# Altium PCB STM32H743I-EVAL2PCBDESIGN.PcbDoc (part 16 of 23)
Units mil, origin at the board's own origin, x right, y up, seen from the top; angles counter-clockwise.
Board outline 6558 x 5417 mil, 8 copper layers (L1_TOP, L2_GND, L3_HS1, L4_POWER, L5_SIG, L6_HS2, L7_GND, L8_BOTTOM), stack 61.368 mil thick; 620 components, 588 nets, 2945 pads, 1724 vias.
Unrouted connection lines stored in the file: 1.
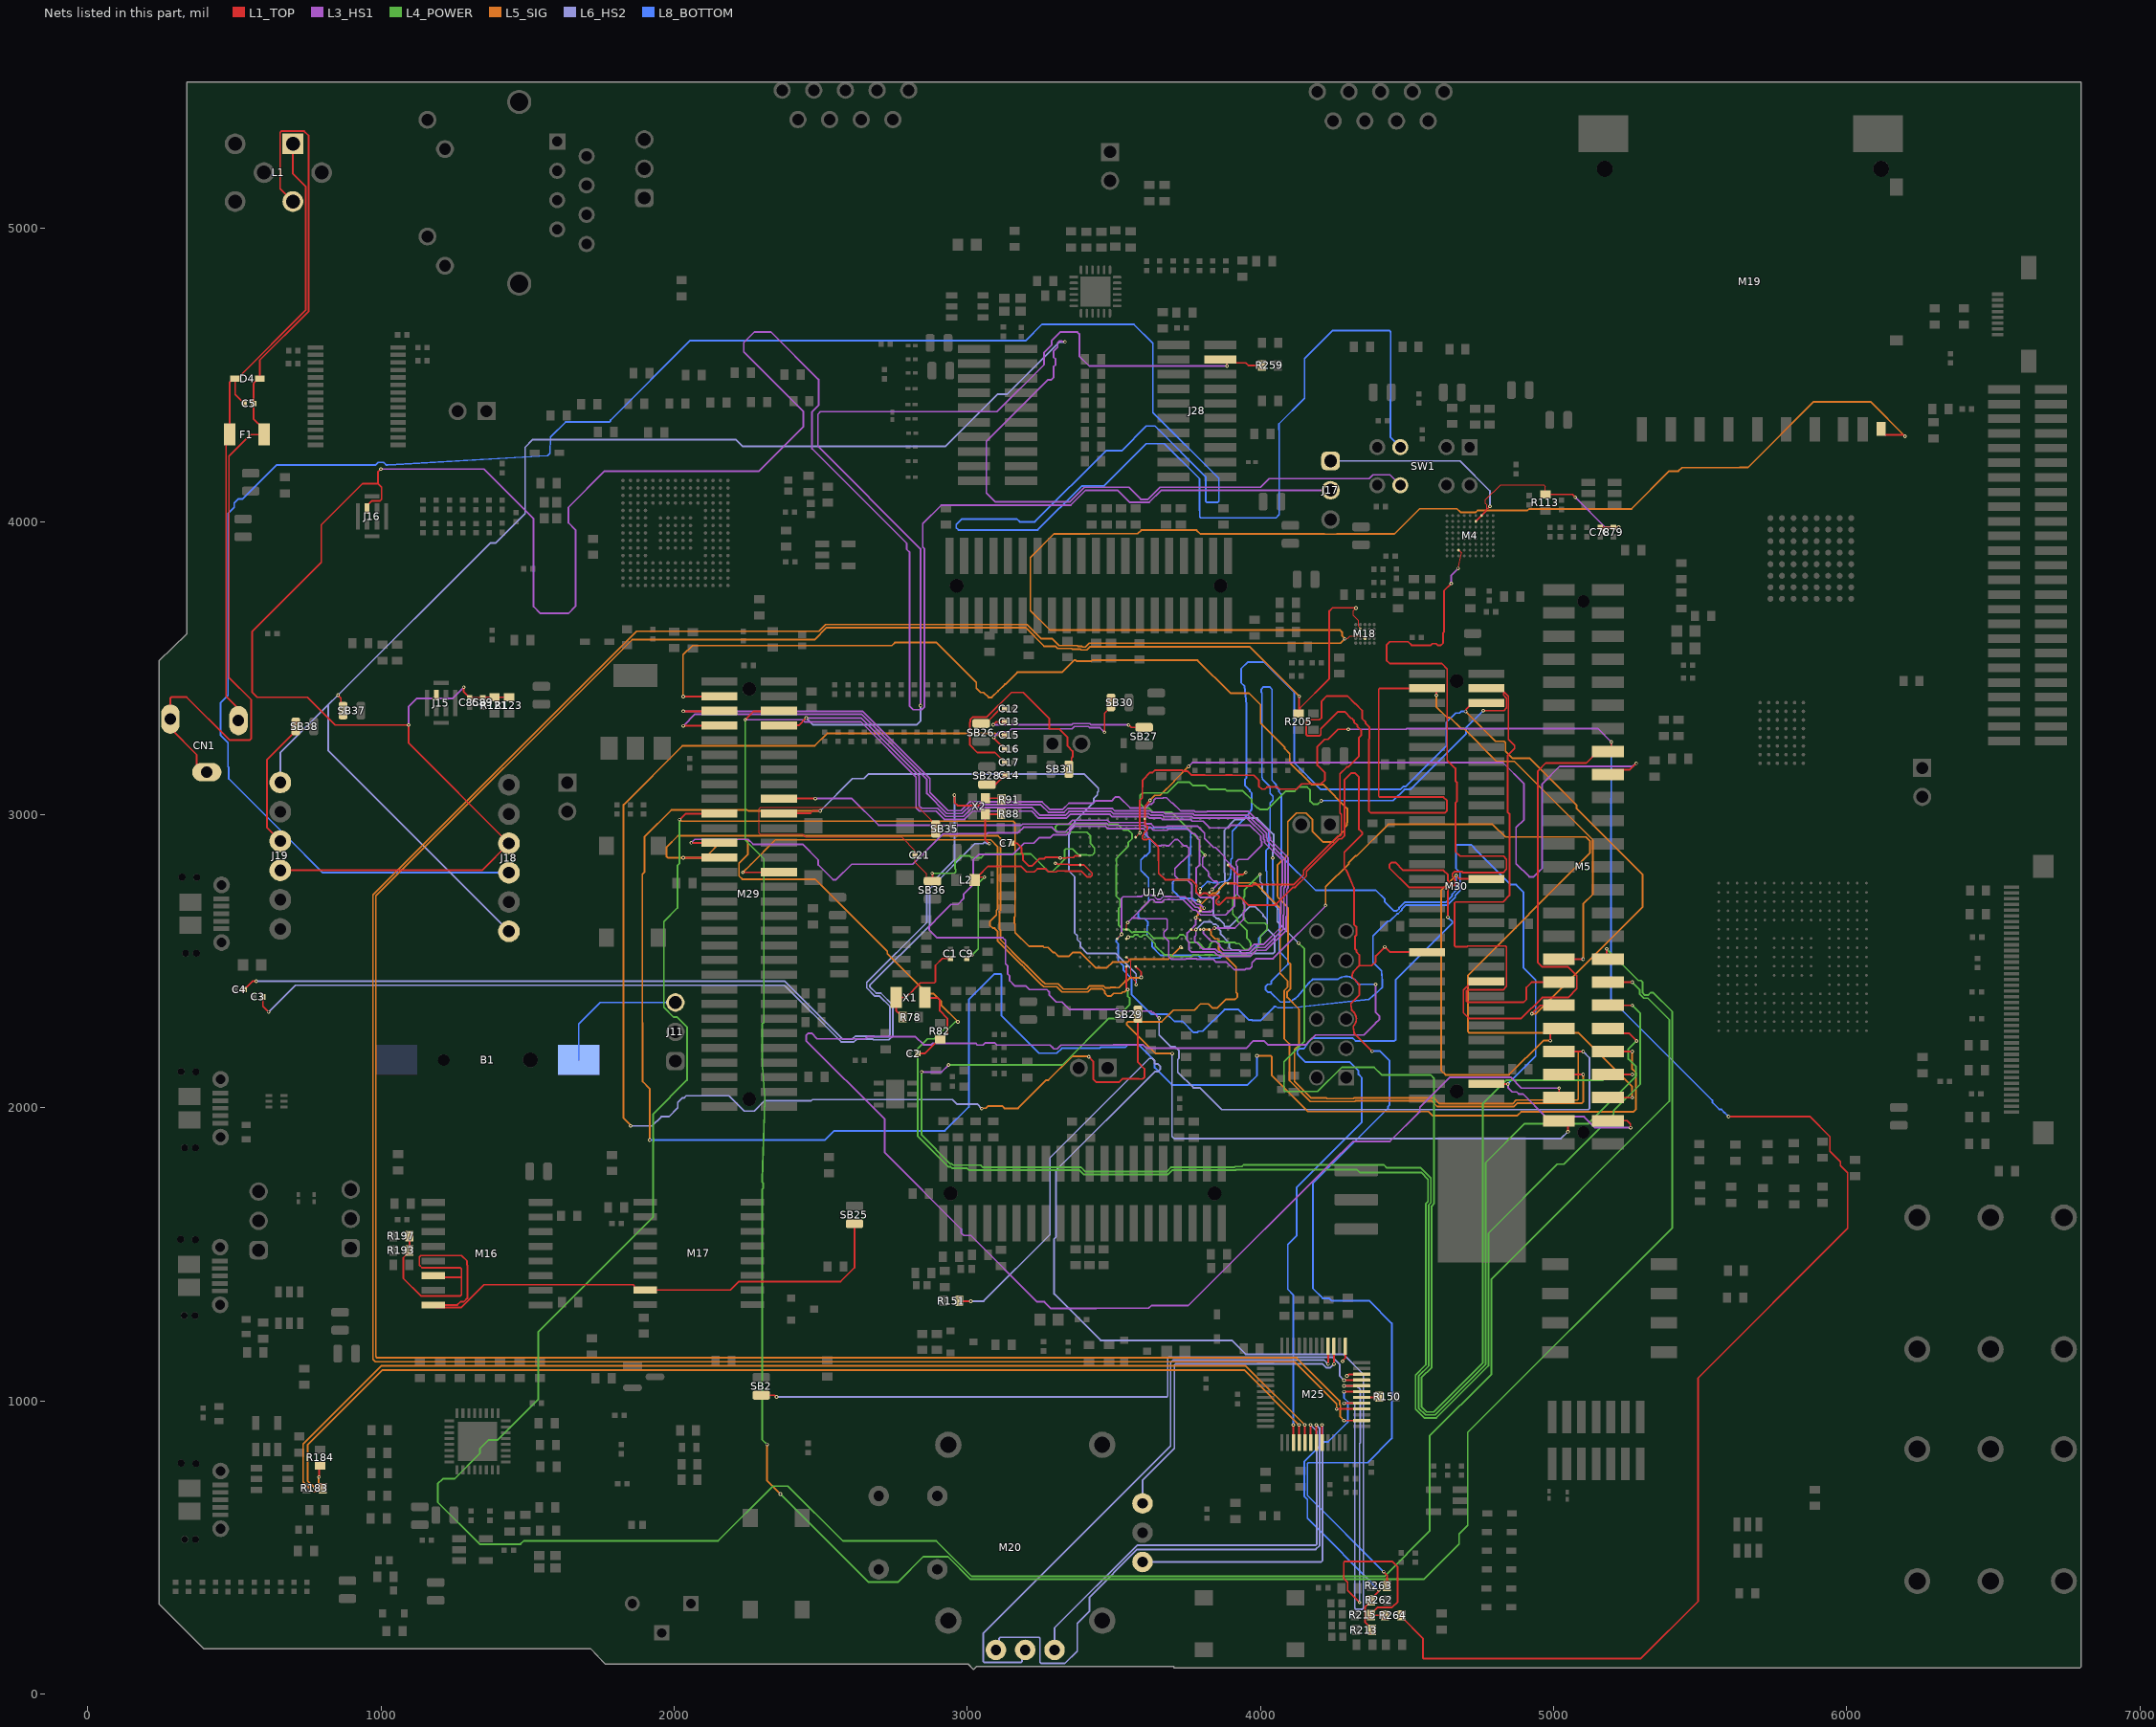
[diagram p13: the nets of this part, all layers, seen from the top]

## Via types
v1: diameter 12, hole 6, L1_TOP to L8_BOTTOM, tented both sides, 1724 vias

## Nets (pads, with @x,y where several pads share a name; then routed paths per layer and width w, separated by ;. In a path a pad name is that pad's centre, name@x,y a point inside that pad or via, vN(x,y) a via of type N, cw(c..) or ccw(c..) an arc to the next point about the centre after c; other vN are vias at no path point) (continued)
LCD_B6: M5.33 M30.22 R263.2 U1A.A8 | length 7776.4
  L1_TOP w6: v1(3623,3049) 3616,3042 3616,3039.62 3605.52,3029.13 3605.52,2967.21 3614.52,2958.21 3614.52,2949.9 3601.99,2937.38 3601.99,2932.57 3597.09,2927.67 3597.09,2919.49 3602.03,2914.56 3611.5,2914.56 3614.54,2917.6 3624.02,2917.6 3648.97,2892.65 3650.54,2891.07 3650.69,2889.23 3652,2883.38 3652.3,2800.48 3674.78,2778 3763.23,2778 3782.44,2758.79 3782.44,2753.82 3781,2752.38 3781,2735.58 3791,2725.58 3797.99,2725.58 3804.33,2731.93 3816.15,2731.93 3823.07,2725.01 3855.26,2725.01 3858.77,2721.49 3858.77,2716.52 3848.49,2706.24 3848.49,2698.78 3853.76,2693.51 3861.22,2693.51 3883.71,2716 3934,2716 3959,2691 4049.62,2691 4110.62,2752 4118.14,2752 4157,2790.86 4157,2805.81 4268.52,2917.33 4275.67,2917.33 4286.22,2927.87 4286.22,3117.6 4310.62,3142 4321.38,3142 4336,3127.38 4336,2949.71 4347.28,2938.42 4347.28,2933.14 4285.75,2871.6 4285.75,2816.86 4293.36,2809.24 ; 4293.38,2809.22 cw(c4289.12,2805) 4294.65,2807.33 4318.53,2750.61 cw(c4313,2748.28) 4319,2748.29 4319,2625.5 4327,2617.5 4327,2588.81 4323,2584.81 4323,2541.63 4327,2537.63 4327,2531.64 4337,2521.64 4337,2485 ; 4308.67,2352.95 cw(c4314.65,2353.53) 4310.64,2358 4337,2384.36 4337,2421.64 4313.74,2444.9 cw(c4317.99,2449.14) 4312.3,2451.06 4316.24,2462.72 cw(c4321.93,2460.8) 4317.68,2465.04 4337,2484.36 4337,2485 ; 4308.68,2352.9 4310.76,2333.13 4312.26,2331.63 ccw(c4316.51,2335.87) 4312.3,2331.59 4313.95,2330.26 cw(c4292,2303) 4316.82,2278.33 4316.82,2275.96 4316.82,2275.65 4319,2255 4320.5,2253.5 v1(4381,2193) ; v1(4420,417) 4431.56,405.44 R263.2@4431.56,369 ; M30.22@4568,2531 4442,2531 v1(4424,2549) 4393,2518 4393,2498.47 4379.53,2485 4337,2485 ; M5.33@5185.32,3136.92 5201.82,3153.42 5260.42,3153.42 v1(5282,3175)
  L3_HS1 w6: v1(3755,3165) 3767.81,3177.81 4827,3177.81 4899,3105.81 4899,2982.96 4872,2955.96 4872,2833.12 4917.12,2788 4932.03,2788 4954,2809.97 4954,2810.1 4961,2817.1 4961,3104.81 5021.19,3165 5270.79,3165 5280.79,3175 v1(5282,3175)
  L5_SIG w6: v1(3623,3049) 3640,3066 3657.67,3066 3705.76,3114.09 3705.76,3115.76 v1(3755,3165)
  L8_BOTTOM w6: v1(4381,2193) 4408.38,2193 4440,2161.38 4440,2008.2 4435,2003.2 4435,1997.57 4179,1741.57 4179,1383.05 4212,1350.05 4233.1,1350.05 4241.65,1341.5 4370.79,1341.5 4448,1264.29 4448,871.62 4365.38,789 4163.51,789 4160,785.49 4160,677 v1(4420,417)
LCD_B7: M5.35 M30.17 R264.2 U1A.C7 | length 8672
  L1_TOP w2: U1A.C7@3574.02,2922.98 v1(3588.99,2937.95)
  L1_TOP w6: v1(3588.99,2937.95) 3588.99,2958.28 3587.52,2959.75 3587.52,3047.9 3596.76,3057.14 3596.76,3093.61 3598,3094.86 3598,3118.38 3623.62,3144 3632.16,3144 3640.38,3152.22 3732.62,3152.22 3736.72,3148.12 3751.8,3148.12 3764.92,3135 3809.58,3135 3809.8,3134.78 3881.2,3134.78 3881.42,3135 3902.58,3135 3902.8,3134.78 3977.22,3134.78 3994,3118 3994,3097.62 4004.62,3087 4015.38,3087 4022.38,3094 4058.14,3094 4065.14,3087 4123.27,3087 4141.27,3105 4206.53,3105 4220,3118.47 4220,3142.18 4194,3168.18 4194,3231.82 4219.03,3256.85 4230.35,3256.85 4264.49,3291 v1(4300,3291) ; R264.2@4479.56,268 4479.56,264.06 4554,189.62 4554,123.51 4557.51,120 5297,120 5493,316 5493,1078 6003,1588 6003,1777.32 5978.5,1801.82 5978.5,1815.96 5942.72,1851.75 5942.72,1901.24 5873.95,1970 v1(5597,1970) ; M30.17@4770.99,2431 4723.47,2431 4704.47,2412 4702.43,2412 4692.48,2402.04 4692.48,2324.1 4711.58,2305 4890.08,2305 4961.1,2376.02 5049.16,2376.02 5079,2405.86 5079,2450.66 5049.16,2480.5 4961.1,2480.5 4946.34,2495.26 4946.34,3148.66 4973.76,3176.08 5111.24,3176.08 5150.82,3215.66 M5.35@5185.32,3215.66 5197,3227.34 v1(5197,3248)
  L3_HS1 w6: v1(4300,3291) 4496.07,3291 4499.07,3294 5151,3294 v1(5197,3248)
  L8_BOTTOM w6: v1(5197,3248) 5197,3055.92 5196,3054.92 5196,2371 5542,2025 5542,2017.47 5565.16,1994.31 5572.69,1994.31 5584.27,1982.73 5584.41,1982.73 5597,1970.14 v1(5597,1970)
LCD_G0: J28.17 M5.4 M29.53 R259.1 U1A.N14 | length 8635.8
  L1_TOP w2: U1A.N14@3794.5,2608.02 3794.98,2608.51 3805.51,2608.51 v1(3806,2609)
  L1_TOP w6: M29.53@2358.5,3305 2425,3305 v1(2450,3330) ; J28.17@3863.12,4553 3874.69,4541.43 J28.17@3886,4541.43 ; v1(3886,4531) J28.17@3886,4541.43 ; R259.1@4004.44,4533 3958.57,4533 3950.13,4541.43 J28.17@3886,4541.43 ; M5.4@5018,1955.82 5032.5,1955.82 5049,1939.32 v1(5049,1918)
  L3_HS1 w6: v1(2450,3330) 2637.43,3330 2835,3132.43 2835,3030.95 2843.95,3022 2897.76,3022 2925.76,2994 2986.24,2994 3016.24,3024 3221.62,3024 3247.62,2998 3333.81,2998 3346.81,3011 3490.47,3011 3498.47,3003 3620.1,3003 3624.73,2998.36 3664.97,2998.36 3670.33,2993 3766.38,2993 3771.38,2988 3954.28,2988 4011,2931.28 4011,2916.53 4014,2913.53 4014,2905.04 4074,2845.04 4074,2757.81 4070,2753.81 4070,2662.95 4068,2660.95 4068,2614.62 4010.38,2557 3977.38,2557 3957.38,2537 3874.62,2537 3861,2550.62 3861,2554.38 3847.38,2568 3831.62,2568 3805.62,2594 3805.62,2608.62 v1(3806,2609) ; v1(2840,3372) 2840,3907 2490,4257 2490,4366.19 2498.81,4375 3101,4375 3262,4536 3262,4577.62 3288,4603.62 3288,4617.76 3316.76,4646.51 3375.49,4646.51 3382,4640 3382,4565 3416,4531 v1(3886,4531)
  L5_SIG w6: v1(3699,2185) 3643.35,2185 3543.84,2284.51 3543.84,2289.49 3547.35,2293 3662.62,2293 3702.62,2333 3774.33,2333 3795.33,2354 3822.67,2354 3836.66,2340.01 3852.34,2340.01 3882.32,2370 3913.38,2370 3921,2377.62 3921,2389.15 3917,2393.15 3917,2480.47 3857,2540.47 3857,2572.49 3853.49,2576 3844.62,2576 3831.5,2589.11 3831.5,2600 3823.5,2608 3807,2608 v1(3806,2609)
  L6_HS2 w6: v1(2450,3330) 2473,3307 2828,3307 2840,3319 v1(2840,3372) ; v1(3699,2185) 3698,2184 3698,1901.51 3704.51,1895 5026,1895 v1(5049,1918)
LCD_G1: M5.6 M29.54 U1A.N13 | length 10997.8
  L1_TOP w4: U1A.N13@3763,2608.02 v1(3780,2608)
  L1_TOP w6: v1(2031,3303) M29.54@2153.5,3303 ; M5.6@5018,2034.56 5019,2035.56 v1(5019,2067)
  L3_HS1 w6: v1(2031,3303) 2071,3343 2638.57,3343 2862,3119.57 2862,3071.9 2929.9,3004 2982.1,3004 3012.1,3034 3250.47,3034 3276.47,3008 3329.67,3008 3342.67,3021 3494.62,3021 3502.62,3013 3624.24,3013 3628.87,3008.36 3669.11,3008.36 3674.47,3003 3770.52,3003 3775.52,2998 3958.43,2998 4021,2935.43 4021,2920.67 4024,2917.67 4024,2909.18 4084,2849.18 4084,2753.67 4080,2749.67 4080,2658.81 4078,2656.81 4078,2610.47 4014.53,2547 3981.53,2547 3961.53,2527 3866.93,2527 3862.93,2531 3856.93,2531 3846.93,2541 3804.38,2541 3782.38,2563 3779.62,2563 3776,2566.62 3776,2584.5 3780,2588.5 v1(3780,2608) ; v1(4393,2421.14) 4393,2325.38 4406,2312.38 4406,2301.62 4398.38,2294 4396.51,2294 4393,2290.49 4393,2288.62 4352.38,2248 4187.5,2248 4154.5,2215 4024.62,2215 4011.62,2228 3975.57,2228 3950.57,2203 3611.34,2203 3599.34,2215 3499.61,2215 3498.61,2214 3319.38,2214 3311.38,2206 3306.38,2201 3295.62,2201 3290.62,2206 3282.62,2214 3101.14,2214 3094.14,2221 3060.53,2221 3053.53,2214 3034.47,2214 3028.47,2220 2882.67,2220 2877.67,2215 2850.33,2215 2823.33,2242 2658.86,2242 2651.86,2235 2487.38,2235 2468.38,2254 2457.62,2254 2450,2246.38 2450,2228.86 2718.14,1960.72 2718.14,1847 2979,1586.14 2979,1572.62 2987.62,1564 3011.76,1564 3237.76,1338 3262.76,1338 3285.76,1315 3439.38,1315 3440.38,1316 3618.86,1316 3627.86,1325 3753.62,1325 4272.62,1844 4274.42,1844 4315.42,1885 4441.38,1885 4544,1987.62 4544,2001.38 4646.62,2104 4853.53,2104 4890.53,2067 v1(5019,2067)
  L6_HS2 w6: v1(3780,2608) 3806,2634 3831.43,2634 3839.43,2626 3848.38,2626 3856,2618.38 3856,2611.43 3864.43,2603 3864.43,2592.04 3893,2563.47 3893,2547.62 3902.62,2538 3925.24,2538 3936.24,2527 4044.49,2527 4048,2530.51 4048,2586 4023,2611 4023,2640.72 4009.69,2654.02 4009.69,2658.69 3982.38,2686 3963.38,2686 3895.46,2618.08 3877.64,2618.08 3876,2619.72 3876,2626.67 3856.67,2646 3849.72,2646 3839,2656.72 3839,2716.47 3858,2735.47 3858,2747.28 3879,2768.28 3879,2799.67 3877,2801.67 3877,2946.76 3914.23,2983.99 3944.96,2983.99 3948.97,2988 3989.43,2988 4045,2932.43 4045,2875.57 4042,2872.57 v1(4042,2852)
  L8_BOTTOM w6: v1(4042,2852) 4042,2774.13 4044,2772.13 4044,2695.88 4065,2674.88 4065,2532.38 4094,2503.38 4094,2489.33 4037.46,2432.79 4037.46,2424.51 4033.94,2421 4024.62,2421 4017,2413.38 4017,2402.62 4025.76,2393.85 4035.06,2393.85 4067.91,2361 4098.02,2361 4119.38,2373 4127,2380.62 4165.34,2425.68 cw(c4192,2403) 4167.29,2427.79 4177.5,2438 4263.72,2438 cw(c4292,2403) 4331.67,2424.25 ccw(c4336.92,2427.14) 4336.47,2421.16 4336.7,2421.14 4336.92,2421.14 v1(4393,2421.14)
LCD_G2: M5.8 M29.56 U1A.M14 | length 5522.7
  L1_TOP w2: v1(3779,2648) 3780.91,2646.09 3787.93,2646.09 U1A.M14@3794.5,2639.52
  L1_TOP w6: v1(2031,3353) M29.56@2153.5,3353 ; M5.8@5018,2113.3 v1(5100.86,2113.3)
  L3_HS1 w6: v1(2031,3353) 2642.72,3353 2872,3123.72 2872,3076.05 2934.05,3014 2977.95,3014 3007.95,3044 3254.62,3044 3280.62,3018 3325.53,3018 3346.53,3039 3429.53,3039 3437.53,3047 3492,3047 3497,3052 3497,3052.38 3504.62,3060 3518.38,3060 3555.38,3023 3609,3023 3622,3036 3628.38,3036 3636,3043.62 3636,3050 3642,3056 3666.62,3056 3668.62,3058 3679.38,3058 3697.38,3040 3700.38,3040 3727.38,3013 3774.66,3013 3777.66,3010 3817.53,3010 3818.48,3010.95 3959.62,3010.95 4031,2939.57 4031,2924.81 4034,2921.81 4034,2913.33 4094,2853.33 4094,2749.53 4090,2745.53 4090,2654.67 4088,2652.67 4088,2606.33 4018.67,2537 3985.67,2537 3965.67,2517 3862.78,2517 3858.78,2521 3852.78,2521 3842.78,2531 3765.51,2531 3756,2540.51 3756,2565.14 3750,2571.14 3750,2596.38 3774.62,2621 3775.49,2621 3779,2624.51 v1(3779,2648)
  L5_SIG w6: v1(3779,2648) 3779,2649.62 3786.73,2657.35 3786.73,2665.73 3795,2674 3795,2691.38 3835.62,2732 3846.47,2732 3881.47,2767 3982.38,2767 4024.69,2724.69 4024.69,2723.32 4067,2681.01 4067,2458.24 4092.52,2432.73 4092.52,2411.19 4081,2399.67 4081,2235.62 4099,2217.62 4099,2092.43 4170.43,2021 4321.43,2021 4324.43,2024 4583,2024 4603.43,2003.57 4864.1,2003.57 4876.53,2016 5097.34,2016 5100.86,2019.51 v1(5100.86,2113.3)
LCD_G3: M5.10 M29.58 U1A.L14 | length 9876.3
  L1_TOP w2: U1A.L14@3794.5,2671.02 3794.63,2671.02 3802.7,2679.09 3806.09,2679.09 v1(3808,2681)
  L1_TOP w6: v1(2031,3403) M29.58@2153.5,3403 ; M5.10@5018,2192.04 v1(5100.86,2192.04)
  L3_HS1 w6: v1(3654,2306) 3636,2324 3631.76,2324 3625.76,2330 3518.81,2330 3513.81,2335 3349.24,2335 3323.24,2361 3302.79,2361 3279,2384.79 3279,2395.38 3271.38,2403 3211.38,2403 3198.38,2416 3161.57,2416 3144,2433.57 3144,2450.19 3138,2456.19 3138,2482.72 3130,2490.72 3130,2571.14 3121.14,2580 2896,2580 2870.25,2605.75 2870.25,2617.99 2890,2637.75 2890,2639.67 2944.33,2694 2959.28,2694 2967.67,2694 2987,2713.33 2987,2727.47 3019.82,2760.3 3019.82,2845.54 3038.49,2864.21 3154.4,2864.21 3193.19,2903 3226.38,2903 3245.38,2922 3283.38,2922 3292.38,2931 3337.52,2931 3367.52,2961 3469.76,2961 3477.76,2953 3599.38,2953 3612,2940.38 3612,2929.62 3648.16,2893.46 3660.1,2893.46 3662.65,2896 3676,2896 3678.54,2893.46 3686.94,2893.46 3708.49,2915 3717.25,2915 3738.79,2893.46 3747.56,2893.46 3756.53,2884.49 3756.53,2864.05 3708,2815.53 3708,2791.09 3721.09,2778 3749.38,2778 3765.5,2761.89 3765.5,2711.12 3782.62,2694 3795,2694 v1(3808,2681)
  L5_SIG w6: v1(2031,3403) 2030.17,3403.83 2030.17,3545.26 2061.92,3577 2742.47,3577 2752.47,3587 2894.53,3587 3030.72,3450.81 3030.72,3432.15 3045.85,3417.02 3055.59,3417.02 3072.62,3400 3083.38,3400 3104.93,3421.54 3104.93,3422.25 3128.04,3445.36 3129.52,3445.36 3170.33,3486.18 3322.95,3486.18 3363.77,3527 3369.73,3527 3372.73,3524 3423.27,3524 3426.27,3527 3785.38,3527 3897.38,3415 3960.28,3415 4000,3375.28 4000,3312.38 4083,3229.38 4083,3225.14 4100,3208.14 4100,3177.47 4174.47,3103 4204,3103 4214.14,3103 4296.22,3020.93 4296.22,3010.78 4296.22,2973.81 4294.54,2972.13 4294.54,2963.13 4286.22,2954.81 4286.22,2946.03 4247.51,2907.33 4212.77,2907.33 4177.79,2942.31 4177.79,2982.49 4154.94,3005.33 4122.63,3005.33 4093,2975.7 4093,2862 4058,2827 4058,2722.12 4058,2721.99 4059,2718.08 4084.44,2691.85 4094,2682.3 4094,2498.47 4102.52,2489.96 4102.52,2407.04 4091,2395.53 4091,2376.47 4132,2335.47 4132,2214.53 4116,2198.53 4116,2089.57 4171.57,2034 4224.19,2034 4227.19,2031 4317.28,2031 4320.28,2034 4591,2034 4611.43,2013.57 4859.96,2013.57 4872.38,2026 5080.49,2026 5084,2029.51 5084,2188.52 5087.51,2192.04 v1(5100.86,2192.04)
  L6_HS2 w6: v1(3654,2306) 3654,2248.38 3694.38,2208 3708.53,2208 3722,2194.53 3722,2168.95 3718,2164.95 3718,2121.05 3771.05,2068 3793.53,2068 3868.23,1993.3 5118.78,1993.3 5122.3,1996.81 5122.3,2170.6 v1(5100.86,2192.04)
LCD_G4: M5.12 M30.31 U1A.K14 | length 4977.3
  L1_TOP w2: v1(3788,2707) 3790.01,2707 U1A.K14@3794.5,2702.51
  L1_TOP w6: v1(4668,2793) 4680,2781 M30.31@4770.99,2781 ; v1(4989,2229) 4989,2254.28 5005.5,2270.78 M5.12@5018,2270.78
  L5_SIG w6: v1(4668,2793) 4616,2741 4616,2127.62 4631.62,2112 4847.86,2112 4964.86,2229 v1(4989,2229)
  L8_BOTTOM w6: 3628.98,2571.4 3630,2570.38 3630,2549.47 3659.86,2519.62 3788.57,2519.62 3797.19,2511 3860.81,2511 3876.81,2527 3951.47,2527 3953.47,2529 3963.53,2529 3974.53,2540 3994,2559.47 3994,2577.38 4023,2606.38 4023,2688.6 4024,2689.6 4024,2763.84 4021.37,2766.47 4021.37,2806.15 4019,2808.53 4019,2877.54 4029,2887.54 4029,2945.33 4033,2949.33 4033,3040.53 4042.49,3050.01 4042.49,3063.27 4033,3072.76 4033,3095.38 4006.81,3121.58 4006.81,3125.33 4004.9,3127.23 4004.9,3415.71 4003,3417.62 4003,3428.38 4010.62,3436 4030.73,3436 4039.25,3427.49 4039.25,3117.42 4053,3103.67 4053,3094.43 4063,3084.43 4063,3078.13 4071,3070.13 4071,2859.02 4188.02,2742 4393.38,2742 4424,2711.38 4424,2702.62 4454.62,2672 4465.38,2672 4473,2679.62 4473,2682.64 4491.36,2701 4632.34,2701 4654.34,2723 4654.34,2728.87 4668,2742.53 v1(4668,2793) ; 3628.98,2571.45 3613.49,2586.94 3613.49,2620.1 3616,2622.62 3616,2633.38 3604.38,2645 3590.62,2645 3583,2652.62 3583,2667.87 3617.99,2702.86 3617.99,2783.39 3592,2809.38 3592,2845.38 3606.62,2860 3610.38,2860 3622,2871.62 3622,2916.62 3607,2931.62 3607,2942.38 3619.62,2955 3747.81,2955 3762,2940.81 3762,2867.47 3756.53,2862 3756.53,2781.67 3753.01,2778.15 3708.77,2778.15 3701,2770.38 3701,2741.62 3712.27,2730.34 3713.35,2730.34 3729.69,2714 3770,2714 3775.85,2708.15 3786.85,2708.15 v1(3788,2707)
LCD_G5: M5.14 M30.55 U1A.J14 | length 3831.9
  L1_TOP w2: v1(3794,2747) 3794.25,2746.75 3794.25,2734.26 U1A.J14@3794.5,2734.01
  L1_TOP w6: v1(4700,3352) 4701.15,3353.15 4701.15,3358.68 4723.47,3381 M30.55@4770.99,3381 ; v1(4926,2321) 4954.52,2349.52 M5.14@5018,2349.52
  L5_SIG w6: v1(4700,3352) 4801.47,3250.53 4831.48,3250.53 4836.24,3245.77 4836.24,3215.76 4859.88,3192.12 4919.27,3192.12 5078,3033.38 5078,3022.29 5303.44,2796.85 5303.44,2684.44 4940,2321 v1(4926,2321)
  L8_BOTTOM w6: v1(3794,2747) 3818.24,2771.24 3823.21,2771.24 3838.13,2767 3853.87,2767 3887.77,2774.76 3896.02,2783 3899.12,2804.2 3899.12,2821.03 3899,2821.16 3899,2846.84 3903.78,2851.62 3903.78,2943.92 3962.01,3006.07 3970.01,3018.37 3970.01,3073.52 3963,3080.53 3963,3084.28 3946.81,3100.47 3946.81,3119.53 3952,3124.72 3952,3376.63 3946,3438.38 3933.91,3450.47 3933.91,3497.68 3957.23,3521 4011.88,3521 4115.25,3417.63 4115.25,3176.37 4205.62,3086 4476.86,3086 4486.86,3096 4495.38,3096 4634,3234.62 4634,3314.86 4666.14,3347 4679.76,3347 4684.76,3352 v1(4700,3352)
LCD_G6: M5.16 M30.57 U1A.J15 | length 4104
  L1_TOP w2: U1A.J15@3825.99,2734.01 3825.99,2735 3835,2744.01 v1(3835,2745)
  L1_TOP w6: v1(4760,3355) 4830.4,3355 4839.51,3364.1 4839.51,3397.9 4829.51,3407.9 M30.57@4829.51,3420 ; M30.57@4770.99,3431 4818.51,3431 M30.57@4829.51,3420 ; M5.16@5018,2428.26 4924.88,2428.26 4907,2410.38 4907,2369.57 4897.43,2360 4706.58,2360 4702.48,2364.1 4702.48,2397.9 4706.58,2402 4827.4,2402 4839.51,2414.1 4839.51,2547.9 4835.41,2552 4706.58,2552 4703.58,2549 4665.51,2549 4662,2552.51 4662,2698.48 4665.51,2702 4827.4,2702 4849.51,2724.1 4849.51,3002.61 4843,3009.12 4843,3201.76 4866.85,3225.62 4866.85,3236.38 4846,3257.24 4846,3403.51 M30.57@4829.51,3420
  L3_HS1 w6: v1(3811,2862) 3811,2860.38 3802.53,2851.9 3802.53,2824.86 3822.38,2805 3822.38,2791.23 3840.62,2773 3851,2773 3854.51,2769.49 3854.51,2764.51 v1(3835,2745)
  L4_POWER w6: v1(3811,2862) 3792.53,2880.47 3792.53,2911.84 3696,3008.36 3633.62,3008.36 3618.98,3023 3603,3023 3590,3036 3590,3067 3597,3074 3682.62,3074 3719.62,3111 3757.62,3111 3769.62,3099 3812.47,3099 3825.47,3086 3880.14,3086 3884.14,3082 3938.81,3082 3970,3050.81 3970,3042.33 3989.33,3023 3992.33,3023 3997.33,3018 4024.67,3018 4043,3036.33 4043,3036.38 4086.62,3080 4116.69,3080 4130.69,3094 4159.38,3094 4169.5,3083.88 4169.5,3046.12 4179.62,3036 4196,3036 v1(4207,3047)
  L8_BOTTOM w6: v1(4207,3047) 4208,3048 4453,3048 4491,3086 4511.52,3086 4701.13,3275.62 4701.13,3296.13 v1(4760,3355)
LCD_G7: M5.18 M30.58 U1A.H17 | length 4196.2
  L1_TOP w6: U1A.H17@3888.98,2765.5 3889.22,2765.28 3917.19,2765.28 3925.47,2757 3971.35,2757 3976.35,2762 4114,2762 4147,2795 4147,2809.95 4264.37,2927.33 4271.53,2927.33 4276.22,2932.01 4276.22,3000.65 4271,3005.87 4271,3139.14 4294.86,3163 4298.51,3163 4336,3200.49 4336,3263.13 4344,3271.13 4344,3286.87 4331,3299.87 4331,3303.84 4319,3315.84 4319,3320.99 4311.38,3328.6 4309.31,3328.6 4286.91,3351 4264,3351 4205.72,3292.72 4205.72,3272.76 4201.62,3268.66 4160.38,3268.66 4156.28,3272.76 4156.28,3315.3 4164.76,3323.78 4201.62,3323.78 4208.55,3330.71 4208.55,3387.28 4226.27,3405 4296.47,3405 4322.47,3379 4323.46,3379 4347,3355.46 4347,3327.44 4359,3315.44 4359,3311.47 4372,3298.47 4372,3259.53 4370,3257.53 4370,3012.51 4376.51,3006 4628.41,3006 4636.52,3014.1 4636.52,3047.9 4624.41,3060 4407.18,3060 4403.66,3063.52 4403.66,3427.49 4407.18,3431 M30.58@4568,3431 4589,3431 4600,3420 v1(4600,3407) ; M5.18@5018,2507 v1(5100.86,2507)
  L5_SIG w6: v1(4600,3407) 4600,3368.36 4637.18,3331.18 4646.49,3331.18 4683.67,3294 4693.52,3294 4805.4,3182.12 4866.11,3182.12 5133.86,2914.37 5133.86,2728 5100.86,2695 v1(5100.86,2507)
LCD_R0: M5.3 M29.38 M30.03 U1A.P5 | length 6413.3
  L1_TOP w2: U1A.P5@3511.03,2576.53 v1(3526,2591.5)
  L1_TOP w6: v1(2058,2904) M29.38@2150.5,2904 ; M30.03@4770.99,2081 v1(4844,2081) ; M5.3@5185.32,1955.82 5251.18,1955.82 5261.85,1945.15 5261.85,1933.15 v1(5263,1932)
  L3_HS1 w6: v1(2058,2904) 2070,2916 2252,2916 2269,2899 2437.53,2899 2491,2845.53 2491,2828.62 2541.62,2778 2552.38,2778 2605.38,2831 2813.62,2831 2917.62,2935 3066.86,2935 3069.86,2938 3172.47,2938 3191.47,2957 3288.88,2957 3304.88,2941 3333.38,2941 3363.38,2971 3473.9,2971 3481.9,2963 3603.53,2963 3608.16,2958.36 3623.11,2958.36 3634.47,2947 3645.53,2947 3681.6,2947 3685.6,2951 3751.81,2951 3766.39,2936.42 3767.95,2936.42 3769.09,2935.28 3774.34,2935.28 3785.08,2924.54 3785.08,2919.29 3792.53,2911.84 3792.53,2829.91 3781,2818.38 3781,2732.38 3796.38,2717 3831.38,2717 3839,2709.39 3839,2676.92 3830.07,2668 3802.62,2668 3786.62,2684 3778.47,2684 3742.47,2720 3696.46,2720 3695.46,2721 3668.38,2721 3658.38,2711 3647.62,2711 3632.6,2726.02 3599.61,2726.02 3594.59,2721 3580.12,2721 3579.12,2720 3531.65,2720 3526,2714.35 v1(3526,2591.5) ; v1(4844,2081) 4845.15,2079.85 4845.15,2067.57 4858.72,2054 4874.38,2054 4881.38,2047 4895.53,2047 4973.03,1969.5 5103.97,1969.5 5141.47,1932 v1(5263,1932)
  L8_BOTTOM w6: v1(3526,2591.5) 3507.5,2573 3507.5,2566.94 3514.56,2559.89 3514.56,2501.11 3533,2482.67 3533,2468.53 3560,2441.53 3560,2386.62 3627.62,2319 3682.62,2319 3706.85,2294.76 3733.85,2294.76 3771.62,2257 3784.33,2257 3788.33,2261 3803.38,2261 3877.38,2335 3924.62,2335 3959.62,2300 3970.38,2300 3972.61,2297.78 4000.16,2297.78 4047.26,2344.88 4052.23,2344.88 4059.63,2341 4108.79,2341 4370.38,2370 4402.53,2398.14 4416,2411.61 4416,2430.67 4413,2467.47 4384,2496.47 4384,2586.53 4434.33,2636.86 4441.36,2636.86 4466.5,2662 4469.53,2662 4483,2675.47 4483,2678.5 4495.5,2691 4636.48,2691 4664.34,2718.86 4664.34,2724.73 4681,2741.38 4681,2802.73 4667,2816.73 4667,2893.49 4670.51,2897 4720,2897 4730,2887 4730,2885 4854,2761 4872.49,2761 4897,2736.49 4897,2478.05 4939,2436.05 4939,2176 v1(4844,2081)
LCD_R1: M5.5 M29.43 U1A.N6 | length 5851
  L1_TOP w4: U1A.N6@3542.53,2608.02 3542.53,2625.36 3547,2629.84 v1(3547,2632)
  L1_TOP w6: M29.43@2358.5,3055 v1(2481,3055) ; M5.5@5185.32,2034.56 v1(5268.18,2034.56)
  L3_HS1 w6: v1(2481,3055) 2605.86,3055 2696.86,2964 3184.33,2964 3188.33,2968 3346.24,2968 3359.24,2981 3478.05,2981 3486.05,2973 3607.67,2973 3612.3,2968.36 3627.25,2968.36 3638.62,2957 3677.46,2957 3681.46,2961 3785.38,2961 3809,2937.38 3809,2918.62 3839.65,2887.96 3846.35,2887.96 3878.67,2855.63 3878.67,2848.94 3911,2816.62 3911,2687.51 3881.49,2658 3795.87,2658 3779.87,2674 3772.18,2674 3736.18,2710 3692.31,2710 3691.31,2711 3684.69,2711 3683.69,2710 3671.53,2710 3662.53,2701 3643.47,2701 3634.47,2710 3625,2710 3562,2647 ; v1(3547,2632) 3562,2647 ; v1(4222,2690) 4222,2688.38 4219,2685.38 4219,2684.86 4043.14,2509 3985.95,2509 3971,2494.05 3971,2481.62 3963.38,2474 3950.66,2474 3947.66,2471 3927.72,2471 3910.44,2471 3884.44,2497 3848.5,2497 3838.5,2507 3782.81,2507 3781.81,2508 3746.19,2508 3745.19,2507 3695,2507 3687.01,2514.99 3687.01,2568.38 3670.48,2584.9 3670.48,2598.49 3682.04,2610.05 3682.04,2641.49 3678.52,2645 3582.69,2645 3580.69,2647 3562,2647
  L5_SIG w6: v1(4222,2690) 4222,2753.57 4301.51,2833.08 4301.51,2837.04 4323.47,2859 4327.43,2859 4435.43,2967 4792,2967 4835.3,2923.7 5110.38,2923.7 5123.86,2910.23 5123.86,2868.27 4708,2452.41 4708,2259.51 4711.51,2256 5083.57,2256 5268.18,2071.39 v1(5268.18,2034.56)
LCD_R2: M5.7 U1A.P6 | length 5203.1
  L1_TOP w2: U1A.P6@3542.53,2576.53 3543.03,2576.53 3548.5,2582 v1(3549,2582)
  L1_TOP w6: M5.7@5185.32,2113.3 v1(5268.18,2113.3)
  L4_POWER w6: v1(3549,2582) 3550.15,2583.15 3563.76,2583.15 3570.62,2590 3581.38,2590 3588.51,2582.87 3593.48,2582.87 3600.13,2589.53 3610.9,2589.53 3641.24,2559.19 3641.24,2552.37 3671.58,2522.03 3693.69,2522.03 3699.95,2515.77 3764.17,2515.77 3769.4,2521 3809.99,2521 3810.99,2522 3835.01,2522 3836.01,2521 3863.28,2521 3865.28,2519 3967.67,2519 3987,2538.33 3987,2546.67 4000,2559.67 4000,2585.62 4023,2608.62 4023,2621.39 4014.38,2630 3957.01,2630 3945,2642.01 3945,2647.62 3942,2650.62 3942,2673.06 3945,2676.06 3945,2698.5 3942,2701.5 3942,2717.38 3945,2720.38 3945,2743.25 v1(3998.37,2796.63) ; v1(4130,2562) 4150,2542 4150,2226.47 4080.41,2156.88 4080.41,2059.1 4083.93,2055.59 4195.09,2055.59 4277.5,2138 4387.62,2138 4413.62,2112 4580.49,2112 4591.5,2100.99 4591.5,1671.83 4584,1664.33 4584,1114.33 4549.31,1079.64 4549.31,979.41 4566.89,961.84 4591.74,961.84 4758,1128.1 4758,2013.38 4838.62,2094 5168.22,2094 5187.52,2113.3 v1(5268.18,2113.3)
  L6_HS2 w6: v1(3998.37,2796.63) 3998.37,2771.24 4006,2763.62 4006,2739.86 4057.43,2688.43 4057.43,2634.57 v1(4130,2562)
LCD_R3: M5.9 M29.41 U1A.T6 | length 8409.4
  L1_TOP w4: U1A.T6@3542.53,2513.54 3557.02,2499.04 3557.02,2449.14 3574.47,2431.7 3574.47,2421.53 v1(3576,2420)
  L1_TOP w6: M29.41@2358.5,3005 2465,3005 2473,3013 v1(2498,3013) ; M5.9@5185.32,2192.04 v1(5268.18,2192.04)
  L5_SIG w6: v1(1916,1890) 1916,2065.37 1892,2089.37 1892,2289.65 1891,2290.65 1891,2796.62 1899,2804.62 1899,2925 1990,3016 2248.85,3016 2251.85,3013 v1(2498,3013) ; v1(3988,2177) 4035.49,2177 4039,2173.49 4039,2110 4162,1987 4572.95,1987 4586.38,1973.57 4876.53,1973.57 4888.95,1986 5271.67,1986 5281.18,1995.51 5281.18,2118.68 5268.18,2131.68 v1(5268.18,2192.04)
  L6_HS2 w6: v1(2498,3013) 2608,3123 2646.86,3123 2662.26,3138.4 3398.98,3138.4 3442,3095.38 3447,3090.38 3447,3079.62 3443.51,3076.13 3443.51,3067.13 3431,3054.62 3431,3041.43 3366,2976.43 3366,2966.28 3350,2950.28 3350,2934.95 3346.51,2931.47 3346.51,2807.87 3366,2788.38 3366,2596.21 3375,2587.21 3375,2573.81 3386,2562.81 3386,2549.72 3409.72,2526 3458.24,2526 3459.24,2527 3506.14,2527 3569,2464.14 3569,2463.28 3576,2456.28 v1(3576,2420)
  L8_BOTTOM w6: v1(1916,1890) 2514.62,1890 2545.62,1921 2923.53,1921 3005,2002.47 3005,2369.38 3092.18,2456.57 3113.15,2456.57 3116.67,2453.05 3116.67,2313.33 3244,2186 3305.41,2186 3322.41,2203 3451.59,2203 3454.59,2206 3539.08,2206 3548.08,2215 3584.38,2215 3639,2160.38 3639,2136.86 3697.86,2078 3956,2078 3988,2110 v1(3988,2177)
LCD_R4: M5.11 M29.33 U1A.U6 | length 7604
  L1_TOP w6: v1(2233.99,2803) M29.33@2356.5,2803 ; U1A.U6@3542.53,2482.04 3542.53,2409.1 3547,2404.62 v1(3547,2403) ; M5.11@5185.32,2270.78 5201.82,2254.28 5256.72,2254.28 v1(5283,2228)
  L3_HS1 w6: v1(2844,2122.19) 2912.19,2122.19 v1(2936,2146)
  L4_POWER w6: v1(2844,2122.19) 2844.14,2122.05 2844.14,1906.86 2943,1808 2947.43,1808 2951.43,1804 3044.7,1804 3051.83,1796.88 3387.55,1796.88 3402.43,1782 3679.57,1782 3694.45,1796.88 3911.35,1796.88 3913.47,1799 3936.28,1799 3942.28,1805 4421.38,1805 4431.38,1795 4546.53,1795 4581.5,1760.03 4581.5,1675.97 4574,1668.47 4574,1118.47 4539.31,1083.79 4539.31,975.27 4562.75,951.84 4595.88,951.84 4768,1123.96 4768,1811.56 4901.9,1945.46 5118.73,1945.46 5281.18,2107.91 5281.18,2140.24 5255.18,2166.24 5255.18,2200.18 v1(5283,2228) ; v1(2936,2146) 3323.53,2146 3482.53,2305 3506.98,2305 3554,2352.02 3554,2373.2 3547,2380.2 v1(3547,2403)
  L5_SIG w6: v1(2233.99,2803) 2234.14,2803 2261,2829.86 2261,2830.01 2344.99,2914 3080.38,2914 3103,2891.38 3103,2677.38 3099,2673.38 3099,2657.62 3077,2635.62 3077,2622.62 3087,2612.62 3093,2612.62 3103,2602.62 3103,2569.43 3185.43,2487 3186.38,2487 3194,2479.38 3194,2478.43 3254.43,2418 3256.38,2418 3261.38,2413 3305.14,2413 3323.14,2395 3411.28,2395 3422.28,2406 3459.38,2406 3469,2396.38 3469,2390.62 3478.62,2381 3489.38,2381 3498.38,2390 3524.67,2390 3529.61,2394.94 3537.31,2394.94 3545.38,2403 v1(3547,2403)
LCD_R5: M5.13 M29.36 U1A.U7 | length 8661.7
  L1_TOP w6: v1(2031,2853) M29.36@2153.5,2853 ; U1A.U7@3574.02,2482.04 3593,2463.06 v1(3593,2445) ; M5.13@5185.32,2349.52 v1(5268.18,2349.52)
  L4_POWER w6: v1(2968,2293) 2959,2293 2935,2269 2920.9,2269 2886.9,2235 2864.19,2235 2831,2201.81 2831,1902.61 2935.61,1798 2943.29,1798 2947.29,1794 2998.53,1794 3005.65,1786.88 3383.41,1786.88 3398.29,1772 3683.71,1772 3698.59,1786.88 3915.49,1786.88 3917.62,1789 4328.6,1789 4338.6,1779 4548.38,1779 4571.5,1755.88 4571.5,1680.12 4564,1672.62 4564,1122.62 4529.31,1087.93 4529.31,971.13 4558.6,941.84 4600.02,941.84 4778,1119.81 4778,1572.61 5012.62,1807.22 5034.62,1807.22 5204.93,1977.53 5204.93,1989.69 5296,2080.76 5296,2321.7 v1(5268.18,2349.52)
  L5_SIG w6: v1(2968,2293) 2911,2350 2911,2362.38 2883.74,2389.64 2862.97,2389.64 2726.74,2525.88 2726.74,2534.26 2481,2780 2232,2780 2220.99,2791.01 2220.99,2833.61 2251,2863.62 2251,2910 2245,2916 2167.5,2916 2104.5,2853 v1(2031,2853) 1977.51,2853 1974,2856.51 1974,2889.29 2012.71,2928 3104.49,2928 3113,2919.49 3113,2673.24 3110,2670.24 3110,2609.76 3113,2606.76 3113,2573.57 3189.57,2497 3190.53,2497 3204,2483.53 3204,2482.57 3258.57,2428 3260.86,2428 3265.86,2423 3309.28,2423 3327.28,2405 3407.14,2405 3418.14,2416 3463.62,2416 3470.62,2409 3486.48,2409 3487.81,2410.33 3505.28,2410.33 3505.62,2410 3516.38,2410 3539.38,2433 3544.26,2433 3554.26,2443 3586.76,2443 3587.61,2443.85 3591.85,2443.85 v1(3593,2445)
LCD_R6: M5.15 M29.42 U1A.R12 | length 11186.3
  L1_TOP w2: v1(3727.76,2548.77) U1A.R12@3731.5,2545.03
  L1_TOP w6: v1(2018,2983) 2038,3003 M29.42@2153.5,3003 ; M5.15@5185.32,2428.26 v1(5268.18,2428.26)
  L4_POWER w6: v1(2018,2983) 2018,2833.53 2010.85,2826.37 2010.85,2681.6 1964.5,2635.26 1964.5,2342.64 1998.14,2309 2009.86,2309 2043.5,2275.36 2043.5,2094.43 1928,1978.93 1928,1896.38 1929,1895.38 1929,1884.62 1928,1883.62 1928,1627.38 1536.5,1235.88 1536.5,1005.97 1396.53,866 1366.18,866 1336.71,836.53 1336.71,820.19 1250.53,734 1210.62,734 1193,716.38 1193,654.23 1336.23,511 1475.62,511 1486.62,522 2149.38,522 2336.38,709 2388,709 2575,522 2894,522 3015,401 4422.38,401 4577,555.62 4577,879.95 4788,1090.95 4788,1415.28 5395,2022.28 5395,2300.62 5321.62,2374 5307.47,2374 5294,2387.47 5294,2401.62 5268.18,2427.43 v1(5268.18,2428.26)
  L5_SIG w6: v1(2018,2983) 2019.62,2983 2024.62,2978 3156.49,2978 3163,2971.49 3163,2652.53 3160,2649.53 3160,2630.47 3163,2627.47 3163,2598 3210,2551 3257.86,2551 3261.86,2547 3275.38,2547 3292.38,2530 3297.4,2530 3310.44,2516.96 3347.49,2516.96 3360.53,2530 3385,2530 3437,2478 3476.47,2478 3495.47,2497 3545.81,2497 3555.81,2507 3685.99,2507 v1(3727.76,2548.77)
LCD_R7: M5.17 M29.55 U1A.N15 | length 10389.4
  L1_TOP w2: U1A.N15@3825.99,2608.02 3835.32,2608.02 3840.29,2613 v1(3843,2613)
  L1_TOP w6: v1(2242,3324) 2271,3353 M29.55@2356.5,3353 ; v1(5181,2542) 5181,2511.32 M5.17@5185.32,2507
  L3_HS1 w6: v1(2242,3324) 2437.62,3324 2444.62,3317 2636.29,3317 2825,3128.29 2825,3023.29 2836.29,3012 2893.62,3012 2921.62,2984 2990.38,2984 3018.38,3012 3219.47,3012 3243.47,2988 3337.95,2988 3350.95,3001 3486.33,3001 3494.33,2993 3615.95,2993 3620.59,2988.36 3660.82,2988.36 3666.19,2983 3762.24,2983 3767.24,2978 3803.62,2978 3826.62,2955 3891.05,2955 3899.88,2963.83 3964.31,2963.83 4001,2927.14 4001,2912.38 4004,2909.38 4004,2894.62 3956.38,2847 3924.62,2847 3917,2839.38 3917,2828.62 3921,2824.62 3921,2728.62 3942,2707.62 3942,2696.38 3945,2693.38 3945,2669.38 3942,2666.38 3942,2642.37 3912.63,2613 v1(3843,2613)
  L4_POWER w6: v1(2242,3324) 2242,2913.38 2305.62,2849.76 2305.62,2291.09 2300,2285.47 2300,2167.86 2300,2165.53 2301.01,2164.53 2301.01,2145.47 2301.01,2141.35 2308.94,2034.9 cw(c2253.91,2030.8) 2309.06,2029 2300,1751.5 2300,1746.53 2301.76,1744.77 2303,1743.53 2303,1724.47 2300,1721.47 2300,868 v1(2316.8,851.2) ; v1(2362,682) 2662,382 2763.77,382 2849.77,468 2933.86,468 3010.86,391 4557.38,391 4677.53,511.14 4677.53,545.05 4707,574.53 4707,892.38 5405,1590.38 5405,2327.38 5339.38,2393 5331.38,2393 5322.38,2384 5311.62,2384 5304,2391.62 5304,2428.38 5298.27,2434.12 5288.88,2434.12 v1(5181,2542)
  L5_SIG w6: v1(2316.8,851.2) 2316.8,727.2 v1(2362,682)
MFX_GPIO0: M20.2 M25.40 | length 2070
  L1_TOP w6: v1(4230.88,1125.49) M25.40@4230.88,1185.21
  L6_HS2 w6: M20.2@3197.5,150 3186.76,139.26 3186.76,110.51 3183.25,107 3058.01,107 3054.5,110.51 3054.5,207.5 3693.49,846.49 3693.49,1130.49 3702,1139 4217.37,1139 v1(4230.88,1125.49)
MFX_GPIO1: M20.3 M25.18 | length 1563.2
  L1_TOP w6: M25.18@4170.84,857.85 v1(4170.84,917.56)
  L6_HS2 w6: M20.3@3297.5,150 3297.5,224.95 3579.55,507 4188.41,507 4191.93,510.51 4191.93,896.47 v1(4170.84,917.56)
MFX_GPIO2: M20.1 M25.19 | length 1949.5
  L1_TOP w6: M25.19@4190.52,857.85 v1(4190.52,917.56)
  L6_HS2 w6: M20.1@3097.5,150 3108.24,160.74 3108.24,189.49 3111.75,193 3243.99,193 3247.5,189.49 3247.5,107.51 3251.01,104 3332.77,104 3374.88,146.12 3374.88,240.75 3417,282.86 3417,330.31 3579.69,493 4188.56,493 4201.93,506.37 4201.93,900.62 4201.36,901.19 4201.36,906.73 v1(4190.52,917.56)
MFX_GPIO3: M20.4 M25.20 | length 1139.4
  L1_TOP w6: M25.20@4210.21,857.85 v1(4210.21,917.56)
  L6_HS2 w6: M20.4@3597.5,450 4206.69,450 4211.93,455.23 4211.93,904.76 4211.36,905.33 4211.36,916.42 v1(4210.21,917.56)
MFX_GPIO4: M20.6 M25.39 | length 1133.1
  L1_TOP w6: v1(4250.56,1125.49) M25.39@4250.56,1185.21
  L6_HS2 w6: M20.6@3597.5,650 3597.5,729.01 3706.49,838 3706.49,1121.98 3710.01,1125.49 4212.49,1125.49 4225.49,1112.49 4236.26,1112.49 4249.26,1125.49 v1(4250.56,1125.49)
MFX_GPIO5: M4.G3 M25.15 | length 5021.8
  L1_TOP w2: v1(4674,3840) 4685,3891.6 4685,3893.26 M4.G3@4675.63,3902.63
  L1_TOP w6: M25.15@4111.78,857.85 v1(4111.78,917.56) ; v1(4639,2650) 4639,2745.41 4632.42,2752 4506.62,2752 4440,2818.62 4440,2829.38 4447.62,2837 4459.86,2837 4486.85,2810 4624.41,2810 4639.71,2794.7 4639.71,2772.98 4655.02,2757.68 4659.99,2757.68 4663.5,2761.19 4663.5,2779.11 4655,2787.62 4655,2798.38 4662.62,2806 4686.74,2806 4690.75,2802 4827.4,2802 4839.51,2814.1 4839.51,2847.9 4828.79,2858.61 4680.72,2858.61 4665.13,2874.19 4665.13,3040.53 4670,3045.39 4670,3110.38 4665.13,3115.25 4665.13,3157.78 4637.07,3185.84 4637.07,3497.34 4618.66,3515.75 4441.11,3515.75 4430,3526.86 4430,3574 4430,3579.14 4440.86,3590 4446,3590 4503.75,3590 4515.75,3578 4580.86,3578 4586.11,3583.25 4599.36,3583.25 4604.62,3578 4615.38,3578 4623,3585.62 4623,3620.14 4625.73,3622.87 4625.73,3763.73 v1(4650.89,3788.89)
  L3_HS1 w6: v1(4650.89,3788.89) 4650.89,3816.89 v1(4674,3840)
  L8_BOTTOM w6: v1(4111.78,917.56) 4111.78,1361.83 4093,1380.62 4093,1533.86 4124,1564.86 4124,1729 4346,1951 4346,2102 4334.16,2113.84 4334.16,2126.16 4304.93,2155.38 4154.23,2155.38 4128.08,2181.54 4126,2183.62 4126,2194.38 4133.62,2202 4144.38,2202 4144.56,2201.82 4148.32,2201.82 4163.41,2223.19 cw(c4192,2203) 4163.8,2223.73 ccw(c4158.94,2227.25) 4164.5,2225 4165.53,2226.03 4177.5,2238 4314.25,2238 4324.25,2228 4457.49,2228 4461,2231.51 4461,2435.8 4654.62,2629.41 4654.62,2634.38 v1(4639,2650)
MFX_GPIO6: M25.16 R183.2 | length 3809.8
  L1_TOP w6: v1(774,702) R183.2@800.56,702 ; M25.16@4131.47,857.85 v1(4131.47,917.56)
  L5_SIG w6: v1(774,702) 749,727 749,849 1005,1105 3944.03,1105 v1(4131.47,917.56)
MFX_GPIO7: M25.17 R184.1 | length 3956.6
  L1_TOP w6: v1(788,740) 788,778.38 788.06,778.44 R184.1@792,778.44 ; M25.17@4151.15,857.85 v1(4151.15,917.56)
  L5_SIG w6: v1(788,740) 787,739 787,696.62 779.38,689 768.62,689 734,723.62 734,853 1000,1119 3949.72,1119 v1(4151.15,917.56)
MFX_GPIO8: M25.29 R151.2 | length 4923.1
  L1_TOP w6: R151.2@2972.56,1341 2973.56,1340 v1(3012,1340) ; v1(4285.14,991.51) M25.29@4344.85,991.51
  L6_HS2 w6: v1(3012,1340) 3055.38,1340 3282,1566.62 3282,1829.38 3620.62,2168 3631.38,2168 3639,2160.38 3639,2152.51 3642.51,2149 3650.38,2149 3658,2141.38 3658,2130.62 3650.38,2123 3639.62,2123 3302,1785.38 3302,1558.33 3296,1552.33 3296,1364.62 3454.62,1206 3902,1206 3949,1159 4282,1159 4351,1090 4351,292.51 4347.49,289 4325.51,289 4322,292.51 4322,987.99 4318.49,991.51 v1(4285.14,991.51)
MFX_GPIO9: M25.30 R150.1 | length 61.1
  L1_TOP w6: M25.30@4345.35,1011.69 4403.13,1011.69 R150.1@4405.44,1014
MFX_GPIO13: M18.B2 M25.26 R205.1 | length 9322
  L1_TOP w2: v1@4324.15,3703.15 4317,3696 4317,3679 4333,3663 4333.26,3645.39 4338.51,3638.34 M18.B2@4340.76,3632.75
  L1_TOP w6: R205.1@4130,3344.56 R205.1@4132,3346.56 ; v1(4132,3404) 4132,3363.82 4132,3349.38 R205.1@4132,3346.56 ; v1(4285.14,932.45) M25.26@4344.85,932.45 ; v1(4326,3705) 4325,3706 4245.91,3706 4235,3695.09 4235,3558.1 4234.28,3557.38 4234.28,3463.28 4134.82,3363.82 4134.82,3349.38 R205.1@4132,3346.56
  L5_SIG w6: v1(4132,3404) 3963,3573 3418.53,3573 3407.53,3562 3388.47,3562 3385.47,3565 3357.5,3565 3355.5,3567 3308.47,3567 3300.47,3575 3261.62,3575 3198.11,3638.5 2520.23,3638.5 2478.72,3597 1856.14,3597 982,2722.86 982,1150.51 985.51,1147 4123,1147 4270,1000 4270,988.26 4273,985.26 4273,966.44 4272.14,965.58 4272.14,945.45 v1(4285.14,932.45)
MFX_GPIO15: M18.D3 M19.10 M25.28 | length 13527.7
  L1_TOP w2: v1(4288,3600) 4289,3601 4297,3601 4305,3609 4348.76,3609 M18.D3@4356.5,3601.25
  L1_TOP w6: v1(4260,972) 4260.16,972.16 4344.52,972.16 M25.28@4344.68,972 ; M19.10@6117.26,4316.2 6117.26,4308.33 6130.01,4295.58 6192.79,4295.58 6197.38,4291 v1(6199,4291)
  L5_SIG w6: v1(4260,972) 4260,989 4116,1133 981,1133 972,1142 972,2727 1871,3626 2493.58,3626 2516.09,3648.5 3203.78,3648.5 3251.28,3601 3288.62,3601 3312.62,3577 3374.86,3577 3376.86,3575 3389.62,3575 3392.62,3572 3403.38,3572 3416.38,3585 4273,3585 v1(4288,3600) 4288,3601.62 4278.37,3611.26 4278.37,3623.25 4271.62,3630 3281.41,3630 3215,3696.41 3215,3877.83 3295.17,3958 3416.48,3958 3417.48,3959 3581.14,3959 3593.14,3971 3782.14,3971 3795.14,3958 4218,3958 4218.5,3957.5 4259.5,3957.5 4260,3958 4457,3958 4543,4044 4670.33,4044 4682.33,4032 4734.53,4032 4740.53,4038 4911.07,4038 4916.07,4043 5265.62,4043 5394.62,4172 5425.86,4172 5437.86,4184 5634.14,4184 5635.14,4185 5662.87,4185 5886.87,4409 6081,4409 v1(6199,4291)
MFX_IO10: M25.31 R213.2 R262.1 | length 1082.2
  L1_TOP w6: v1(4285.14,1030.88) M25.31@4344.85,1030.88 ; R213.2@4380.56,218 4380.56,221.94 4356.78,245.72 4356.78,295.84 4377,316.06 R262.1@4377,320 4377,323.94 4402.85,349.79 4402.85,353.85 v1(4404,355)
  L8_BOTTOM w6: v1(4285.14,1030.88) 4285.14,1009.89 4298.14,996.89 4298.14,927.07 4231.14,860.07 4217,860.07 4150,793.07 4150,672.86 4160,662.86 4160,599 v1(4404,355)
MFX_IO11: M25.32 R215.2 R264.1 | length 1477.6
  L1_TOP w6: v1(4285.14,1050.56) M25.32@4344.85,1050.56 ; v1(4338,312) 4297.22,352.78 4297.22,380.62 4284,393.84 4284,448.49 4287.51,452 4448.92,452 4468,432.92 4468,314.49 4448.8,295.28 4399.91,295.28 4377.56,272.94 R215.2@4377.56,269 4378.56,268 R264.1@4424.44,268
  L6_HS2 w6: v1(4285.14,1050.56) 4328.49,1050.56 4341,1038.05 4341,857.19 4338,854.19 v1(4338,312)
MFX_IO12: M25.33 SB2.1 | length 2237.4
  L1_TOP w6: SB2.1@2297,1019 2341.38,1019 2347.38,1013 v1(2349,1013) ; v1(4285.14,1070.25) M25.33@4344.85,1070.25
  L6_HS2 w6: v1(2349,1013) 3679.98,1013 3683.49,1016.51 3683.49,1144.98 3687.51,1149 4245.44,1149 4269.89,1124.55 4269.89,1085.5 v1(4285.14,1070.25)
MFX_SWCLK: M25.37 | length 54.3
  L1_TOP w6: v1(4280,1135) 4280,1136.35 4289.93,1146.28 M25.37@4289.93,1185.21
MFX_SWDIO: M25.34 | length 51.9
  L1_TOP w6: v1(4295,1085) 4296.62,1085 4301.56,1089.93 M25.34@4344.85,1089.93
MIC_BIAS1: C78.1 C79.1 J17.1 M4.A7 M4.B6 R113.1 | length 1364
  L1_TOP w4: 4768.05,4037.05 4768.05,4039.59 4772,4043.54 4772,4058.46 4768.05,4062.41 4768.05,4074.05 4819,4125 4966,4125 4972,4119 R113.1@4972,4092.56
  L1_TOP w6: M4.B6@4734.69,4001.06 M4.A7@4754.37,4020.74 4768.05,4034.42 4768.05,4037.05 v1(4783,4052) ; R113.1@4972,4092.56 5064.44,4092.56 v1(5074,4083) ; C78.1@5159,3979.83 5203.83,3979.83 C79.1@5204,3980 5205,3981 v1(5222,3981)
  L3_HS1 w6: v1(5074,4083) 5176,3981 v1(5222,3981)
  L6_HS2 w6: J17.1@4239,4207 4680.81,4207 4783,4104.81 v1(4783,4052)
MIC_CLK: J18.3 J19.3 SB38.1 SW1.3 | length 10520.1
  L1_TOP w6: J19.3@656,2910 611,2955 611,3188 709,3286 SB38.1@709,3301
  L8_BOTTOM w6: J18.3@1436,2802 800.36,2802 674.18,2928.18 480.1,3122.26 480.1,3161.46 477.72,3163.84 477.72,3245.55 452,3271.28 452,3380.72 477.72,3406.45 477.72,4028.11 499,4049.38 499,4063.53 512.47,4077 526.62,4077 642.62,4193 980.47,4193 989.47,4202 1008.53,4202 1015.77,4194.76 1017.53,4193 1022.5,4193 1568.38,4225 1576,4232.62 1578,4288.38 1579.76,4290.14 1629.62,4340 1779.49,4340 1783,4343.51 1783,4346.53 2053.47,4617 3198.78,4617 3254.78,4673 3568.27,4673 3632.88,4608.38 3632.88,4372.53 3858,4147.41 3858,4069.51 3854.49,4066 3816.63,4066 3813.12,4069.51 3813.12,4153.24 3640.35,4326 3610.36,4326 3526.36,4242 3473.38,4242 3230.38,3999 3178.53,3999 3168.53,4009 2981.12,4009 2962,3989.88 2962,3979.11 2969.62,3971.5 3240.07,3971.5 3389.57,4121 3465.04,4121 3610.04,4266 3672.07,4266 3792,4146.07 3792,4037.62 3793.12,4036.5 3793.12,4016.74 3796.86,4013 4053.2,4013 4064,4023.8 4064,4313.47 4063,4314.47 4063,4333.53 4150.31,4420.83 4150.31,4555.83 4246.47,4652 4439.49,4652 4443,4648.49 4443,4647.14 4444,4646.14 4444,4415.53 4443,4414.53 4443,4288.22 SW1.3@4477.26,4253.96
MIC_DATA: J18.1 J19.1 SB37.1 SW1.7 | length 6763.8
  L1_TOP w6: v1(853,3408) 853,3406.79 863,3396.79 863,3381.66 870,3374.66 SB37.1@870,3355
  L3_HS1 w6: v1(3333,4613) 3331.85,4614.15 3323.32,4614.15 3321,4616.47 3315,4616.47 3308,4609.47 3308,4595.33 3294,4581.33 3294,4561.53 3301,4554.53 3301,4535.47 3294,4528.47 3294,4491.62 3286.38,4484 3275,4484 3065,4274 3065,4098 3096,4067 3349.47,4067 3399.47,4117 3550.62,4117 3591.62,4076 3616.47,4076 3657.47,4117 4000.71,4117 4030.21,4146.5 4370.69,4146.5 4383.79,4159.6 4441.7,4159.6 SW1.7@4477.26,4124.04
  L6_HS2 w6: J19.1@656,3110 656,3211 819,3374 ; J18.1@1436,2602 819,3219 819,3374 ; v1(3333,4613) 3314.5,4613 3136.5,4435 3103.62,4435 2925.62,4257 2232.95,4257 2209.95,4280 1517.51,4280 1491,4253.49 1491,4027.62 1390.23,3926.84 1371.84,3926.84 v1(853,3408) 819,3374
MIC_VDD: C85.1 C89.1 J15.1 J16.1 J17.2 J18.4 J19.4 R121.1 R123.1 | length 9968.9
  L1_TOP w6: J19.4@656,2810 1344,2810 J18.4@1436,2902 1094,3244 v1(1094,3306) 842.47,3306 747.88,3400.59 576.72,3400.59 560.12,3417.19 560.12,3625.79 796,3861.67 796,3989 937,4130 989,4130 ; J16.1@952.27,4044.57 952.27,4055.4 967.14,4070.28 995.74,4070.28 1001.59,4076.12 1001.59,4117.41 989,4130 ; v1(999,4179) 989,4169 989,4130 ; v1(1179,3396) 1183.13,3396 1188,3400.87 J15.1@1188,3408 ; v1(1282,3435) 1282,3418.83 1295.7,3405.13 1295.7,3405.05 1301.92,3398.83 C85.1@1302,3398.83 C89.1@1347,3398.83 1348.73,3400.56 R121.1@1387,3400.56 R123.1@1436,3400.56
  L3_HS1 w6: v1(999,4179) 1350.38,4179 1520,4009.38 1520,3709.88 1543.09,3686.79 1638.91,3686.79 1663.21,3711.09 1663.21,3971.5 1639,3995.71 1639,4048.38 1762.62,4172 2289,4172 2440,4323 2440,4376.78 2237,4579.78 2237,4611 2273,4647 2330.38,4647 2492.21,4485.18 2492.21,4396.69 2470,4374.48 2470,4248.72 2793,3925.72 2793,3905.53 2803,3895.53 2803,3369.6 2814.6,3358 2844.39,3358 2854,3367.62 2854,3907.14 2848,3913.14 2848,3993.16 2910.84,4056 3352.62,4056 3403.62,4107 3512.38,4107 3553.38,4066 3620.62,4066 3661.62,4107 J17.2@4239,4107 ; v1(1094,3306) 1094,3369 1121,3396 v1(1179,3396) 1243,3396 v1(1282,3435)
NCS2: M16.6 M16.8 M17.7 R193.2 R197.1 SB25.1 | length 2831.9
  L1_TOP w6: R197.1@1096.56,1562 R193.2@1096.56,1513 1096.56,1509.06 1075.78,1488.28 1075.78,1417.64 1135.23,1358.19 1270.49,1358.19 1274,1361.7 1274,1421 ; M16.6@1177.73,1427 1183.73,1421 1274,1421 ; SB25.1@2615,1604 2615,1454.05 2567.77,1406.81 2220.62,1406.81 2191.81,1378 M17.7@1900.73,1378 1872.39,1378 1863.57,1386.81 1863.57,1392.3 1860.06,1395.81 1350.81,1395.81 1274,1319 1185.73,1319 M16.8@1177.73,1327 1260.14,1327 1271.33,1338.19 1282.28,1338.19 1294,1349.9 1294,1462.28 1293,1463.28 1293,1477.63 1274.82,1495.81 1135.23,1495.81 1130.57,1491.16 1130.57,1462.84 1139.42,1454 1270.49,1454 1274,1450.49 1274,1421
NetB1_P: B1.P J11.3 | length 482.6
  L8_BOTTOM w6: B1.P@1674.05,2163 1674.05,2285.05 1748,2359 J11.3@2004,2359
NetC1_2: C1.2 R78.1 X1.1 | length 352.1
  L1_TOP w6: R78.1@2779.44,2309 2779.44,2312.94 2768.66,2323.72 2764.72,2323.72 2756.79,2331.65 X1.1@2756.79,2376 2790.19,2376 2840.03,2425.84 2887.49,2425.84 2891,2429.35 2891,2485.72 2914.45,2509.17 C1.2@2942,2509.17
NetC2_2: C2.2 R82.1 X1.2 | length 306.6
  L1_TOP w6: C2.2@2832,2185 2854.62,2185 2903.06,2233.44 2910.94,2233.44 2931.72,2254.22 2931.72,2305.24 2906,2330.95 2906,2367.38 2898.38,2375 2856.21,2375 X1.2@2855.21,2376
NetC3_2: C3.2 R88.1 X2.1 | length 3376.5
  L1_TOP w6: C3.2@596.83,2378 596.83,2346.17 v1(616,2327) ; v1(3075,2901) 3061.31,2914.69 X2.1@3061.31,3001 3113.44,3001 R88.1@3115.44,3003
  L6_HS2 w6: v1(616,2327) 707,2418 2376.39,2418 2569.89,2224.5 2612.41,2224.5 2621.91,2234 2677.38,2234 2679.33,2232.05 2732.53,2232.05 2746,2245.53 2746,2349.91 2704.94,2390.97 2689.06,2390.97 2667,2413.03 2667,2418 2871.69,2622.69 2871.69,2746.83 3025.86,2901 3052.86,2901 3057,2905.14 3061.97,2905.14 3064.96,2902.15 3073.85,2902.15 v1(3075,2901)
NetC4_2: C4.2 R91.1 X2.2 | length 3491.3
  L1_TOP w6: C4.2@532.83,2403 532.83,2403.08 539.05,2409.3 539.13,2409.3 561.83,2432 v1(574,2432) ; v1(2956,3067) 2956,3041.62 2966.22,3031.4 3038.56,3031.4 3061.31,3054.15 X2.2@3061.31,3056.12 3112.32,3056.12 R91.1@3116.44,3052
  L6_HS2 w6: v1(574,2432) 2376.53,2432 2574.03,2234.5 2608.27,2234.5 2617.77,2244 2681.53,2244 2683.47,2242.05 2728.38,2242.05 2736,2249.67 2736,2345.77 2700.8,2380.97 2684.92,2380.97 2657,2408.89 2657,2427.62 2861.69,2632.31 2861.69,2750.98 2956,2845.28 v1(2956,3067)
NetC5_1: C5.1 CN1.1 D4.1 F1.1 L1.1 | length 2185.3
  L1_TOP w6: CN1.1@517.22,3357.5 471,3403.72 471,4285.06 F1.1@482.94,4297 482.94,4474.37 495.57,4487 D4.1@501.87,4487 ; C5.1@533,4403 533,4403.08 501.87,4434.21 D4.1@501.87,4487 ; L1.1@698.85,5289 698.85,5187.08 742.28,5143.65 742.28,4721.11 508.17,4487 D4.1@501.87,4487
NetC5_2: C5.2 CN1.2 CN1.3 D4.2 F1.2 L1.2 | length 3237.2
  L1_TOP w6: CN1.2@281,3294.5 370.61,3204.89 370.61,3167.29 396.94,3140.96 CN1.3@399.11,3140.96 ; CN1.2@281,3326 281,3397.99 284.51,3401.51 335.91,3401.51 482.41,3255.01 552.03,3255.01 556.72,3259.69 556.72,3392.31 481,3468.02 481,4224 554,4297 F1.2@601.06,4297 601.06,4314.72 564.67,4351.11 C5.2@564.67,4403 564.67,4471.84 579.83,4487 D4.2@586.13,4487 586.13,4550.81 752.28,4716.97 752.28,5317.75 737.6,5332.43 660.1,5332.43 655.42,5327.75 655.42,5135.58 L1.2@698.85,5092.15
NetC7_1: C7.1 U1A.E1 | length 305.4
  L1_TOP w6: C7.1@3150.83,2903 3169.05,2903 3185.33,2886.72 3185.33,2868.28 3189.62,2864 3189.62,2845 3209.62,2825 3220.38,2825 3245.38,2850 3262.92,2850 3267.92,2855 3308.7,2855 3310.55,2853.15 3315.85,2853.15 v1(3317,2852) 3338.37,2852 3340.37,2854 3361.69,2854 3367.68,2859.99 U1A.E1@3385.05,2859.99
NetC9_1: C9.1 L2.2 U1A.F1 | length 923.2
  L1_TOP w6: C9.1@2998,2509.33 2998.08,2509.33 3009.75,2521 v1(3016,2521) ; L2.2@3025.1,2777 3038.93,2790.83 3038.93,2788.68 3040.61,2787 v1(3058,2787) ; L2.2@3038.14,2791.61 3070.53,2824 3182.33,2824 3201.33,2805 3228.67,2805 3238.67,2815 3267.62,2815 3277.62,2805 3304.01,2805 3307.01,2808 3333.41,2808 3334.4,2807.01 3389.18,2807.01 3408.19,2788 3420.27,2788 3425.54,2793.27 3425.54,2800.73 3397.77,2828.5 U1A.F1@3385.05,2828.5 3347.86,2828.5 3345.36,2831 3308.3,2831 3306.45,2832.85 3302.77,2832.85 3301.62,2834 v1@3300.48,2832.85
  L4_POWER w6: v1(3016,2521) 3037,2542 3037,2766 v1(3058,2787)
  other v1: 3300,2834
NetC12_2: C12.2 SB26.1 | length 100.8
  L1_TOP w6: SB26.1@3047,3311 3057.44,3321.44 3072.44,3321.44 3105.7,3354.7 3120.78,3354.7 3127,3360.92 C12.2@3127,3361
NetC13_2: C13.2 SB27.1 | length 565.8
  L1_TOP w6: v1(3088,3307) 3089.21,3307 3099.21,3317 C13.2@3127.17,3317 ; v1(3550,3306) 3551.62,3306 3559.62,3298 SB27.1@3603,3298
  L3_HS1 w6: v1(3088,3307) 3088.5,3306.5 3355.91,3306.5 3360.42,3311 3417.58,3311 3422.09,3306.5 3549.5,3306.5 v1(3550,3306)
NetC14_2: C14.2 SB28.1 | length 74.5
  L1_TOP w6: SB28.1@3067,3103 3096.25,3103 3128.17,3134.92 C14.2@3128.17,3135
NetC15_2: C15.2 SB29.1 | length 4751.2
  L1_TOP w6: v1(3115,3270) 3126.17,3270 C15.2@3127.17,3271 ; v1(3414,2174) 3429.42,2158.58 3429.42,2097.54 3439.97,2087 3516.88,2087 3528.35,2098.46 3585.15,2098.46 3585.62,2098 3596.38,2098 3598.38,2100 3600.49,2100 3604,2103.51 3604,2133.16 3582,2155.16 SB29.1@3582,2319
  L5_SIG w6: v1@1852,1939 1827,1964 1827,3034 2028,3235 2479.38,3235 2521.38,3277 3095.38,3277 3101.24,3271.15 3113.85,3271.15 v1(3115,3270) ; v1(3049,1997) 3050.15,1998.15 3063.76,1998.15 3071.62,2006 3118.31,2006 3126.31,1998 3173,1998 3269,2094 3276.27,2094 3357.27,2175 3413,2175 v1(3414,2174)
  L6_HS2 w6: v1(1851,1938) 1924.47,1938 1955.85,1969.38 1981.77,1969.38 2012,1999.62 2012,2018 2027,2033 2032.47,2033 2040.47,2041 2186.83,2041 2239.26,1988.57 2272.74,1988.57 2308.17,2024 2467.47,2024 2471.47,2028 2948.62,2028 2964.12,2012.5 3033.5,2012.5 v1(3049,1997)
NetC16_2: C16.2 SB30.1 | length 568.1
  L1_TOP w6: v1(3090,3264) 3091.15,3262.85 3091.15,3260.1 3127.17,3224.08 C16.2@3127.17,3224 ; v1(3468,3281) 3468,3346 3490,3368 SB30.1@3490,3383
  L3_HS1 w6: v1(3090,3264) 3109,3283 3140.47,3283 3150.47,3293 3356.56,3293 3364.56,3301 3413.44,3301 3417.94,3296.5 3452.5,3296.5 v1(3468,3281)
NetC17_2: C17.2 SB31.1 | length 806
  L1_TOP w6: C17.2@3127.17,3179 3127.17,3179.08 3094.25,3212 3034.49,3212 3009,3237.49 3009,3315.72 3010,3316.72 3010,3324.51 3018.49,3333 3066.59,3333 3150.59,3417 3191,3417 3279,3329 3279,3293 3312.9,3293 3341.95,3263.95 3341.95,3233.89 3359,3216.84 3359,3197.62 3355.22,3193.84 3355.22,3164.22 SB31.1@3346,3155
NetC21_1: C21.1 SB35.1 SB36.2 U1A.F17 | length 3879.3
  L1_TOP w4: SB36.2@2881,2773 2873.08,2773 2860.5,2785.58 2860.5,2798.92 2822.17,2837.25 C21.1@2822.17,2862 2822.17,2877.3 2775.47,2924 2448.5,2924 2438.5,2934 2293.5,2934 2289.98,2937.52 2289.98,3020.48 2294.5,3025 2833,3025 2880.91,2977.09 2880.91,2962.09 SB35.1@2892,2951
  L1_TOP w6: v1@2879,2801 2881,2799 SB36.2@2881,2773 ; U1A.F17@3888.98,2828.5 3921.48,2796 3941.38,2796 3948.38,2803 v1(3950,2803)
  L4_POWER w6: v1(2880,2800) 2955.16,2800 2960.43,2805.27 2960.43,2812.73 2958,2815.16 2958,2840.84 2976.16,2859 3008.13,2859 3014.2,2852.93 3047.4,2852.93 3060.47,2866 3216.62,2866 3247.62,2835 3277.62,2805 3289.38,2805 3322.38,2838 3322.38,2839 3332,2848.62 3332,2879.49 3335.51,2883 3358.4,2883 3378.4,2863 3406.38,2863 3407.42,2861.97 3426.42,2861.97 3434.03,2869.58 3434.03,2887.11 3420.07,2901.07 3420.07,2927.93 3407.65,2940.35 3309.26,2940.35 3301,2948.62 3301,2959.38 3308.62,2967 3513.13,2967 3533.13,2947 3549.7,2947 3562,2934.7 3562,2917.3 3548.56,2903.86 3548.56,2891.56 3514,2857 3514,2855.3 3507.5,2848.81 3507.5,2841.88 3509,2840.38 3509,2829.62 3507.5,2828.12 3507.5,2766.48 3508,2765.98 3508,2721.7 3520.21,2709.49 3520.21,2684.74 3516,2680.53 3516,2623.9 3531.9,2608 3550.62,2608 3560.06,2598.56 3565.03,2598.56 3566.47,2600 3614.57,2600 3636.08,2578.5 3713.88,2578.5 3725.46,2590.07 3737.44,2590.07 3745.05,2582.46 3745.05,2576.09 3757.62,2563.53 3789.11,2563.53 3799.5,2553.14 3799.5,2551.12 3808.62,2542 3819.38,2542 3828.5,2551.12 3828.5,2557.88 3837.62,2567 3875.27,2567 3878.27,2564 3913.38,2564 3917.38,2560 3927.62,2560 3948.62,2539 3951.05,2539 3959.38,2539 3967,2546.62 3967,2554.95 3967,2561.62 3964,2564.62 3964,2568.38 3954,2578.38 3954,2604.73 3921.37,2637.36 3921.37,2645.1 3908,2658.47 3908,2658.6 3905.78,2660.82 3905.78,2714.45 3921.37,2730.04 3921.37,2784.76 3929.98,2793.37 3938.74,2793.37 3948.38,2803 v1(3950,2803)